# Altium PCB Motherboard.PcbDoc (part 3 of 4)
Units mm, origin at the board's own origin, x right, y up, seen from the top; angles counter-clockwise.
Board outline 133.86 x 61.62 mm, 4 copper layers (Top Layer, Ground Plane, Power Plane, Bottom Layer), stack 1.586 mm thick; 226 components, 149 nets, 791 pads, 852 vias.
Unrouted connection lines stored in the file: 19.
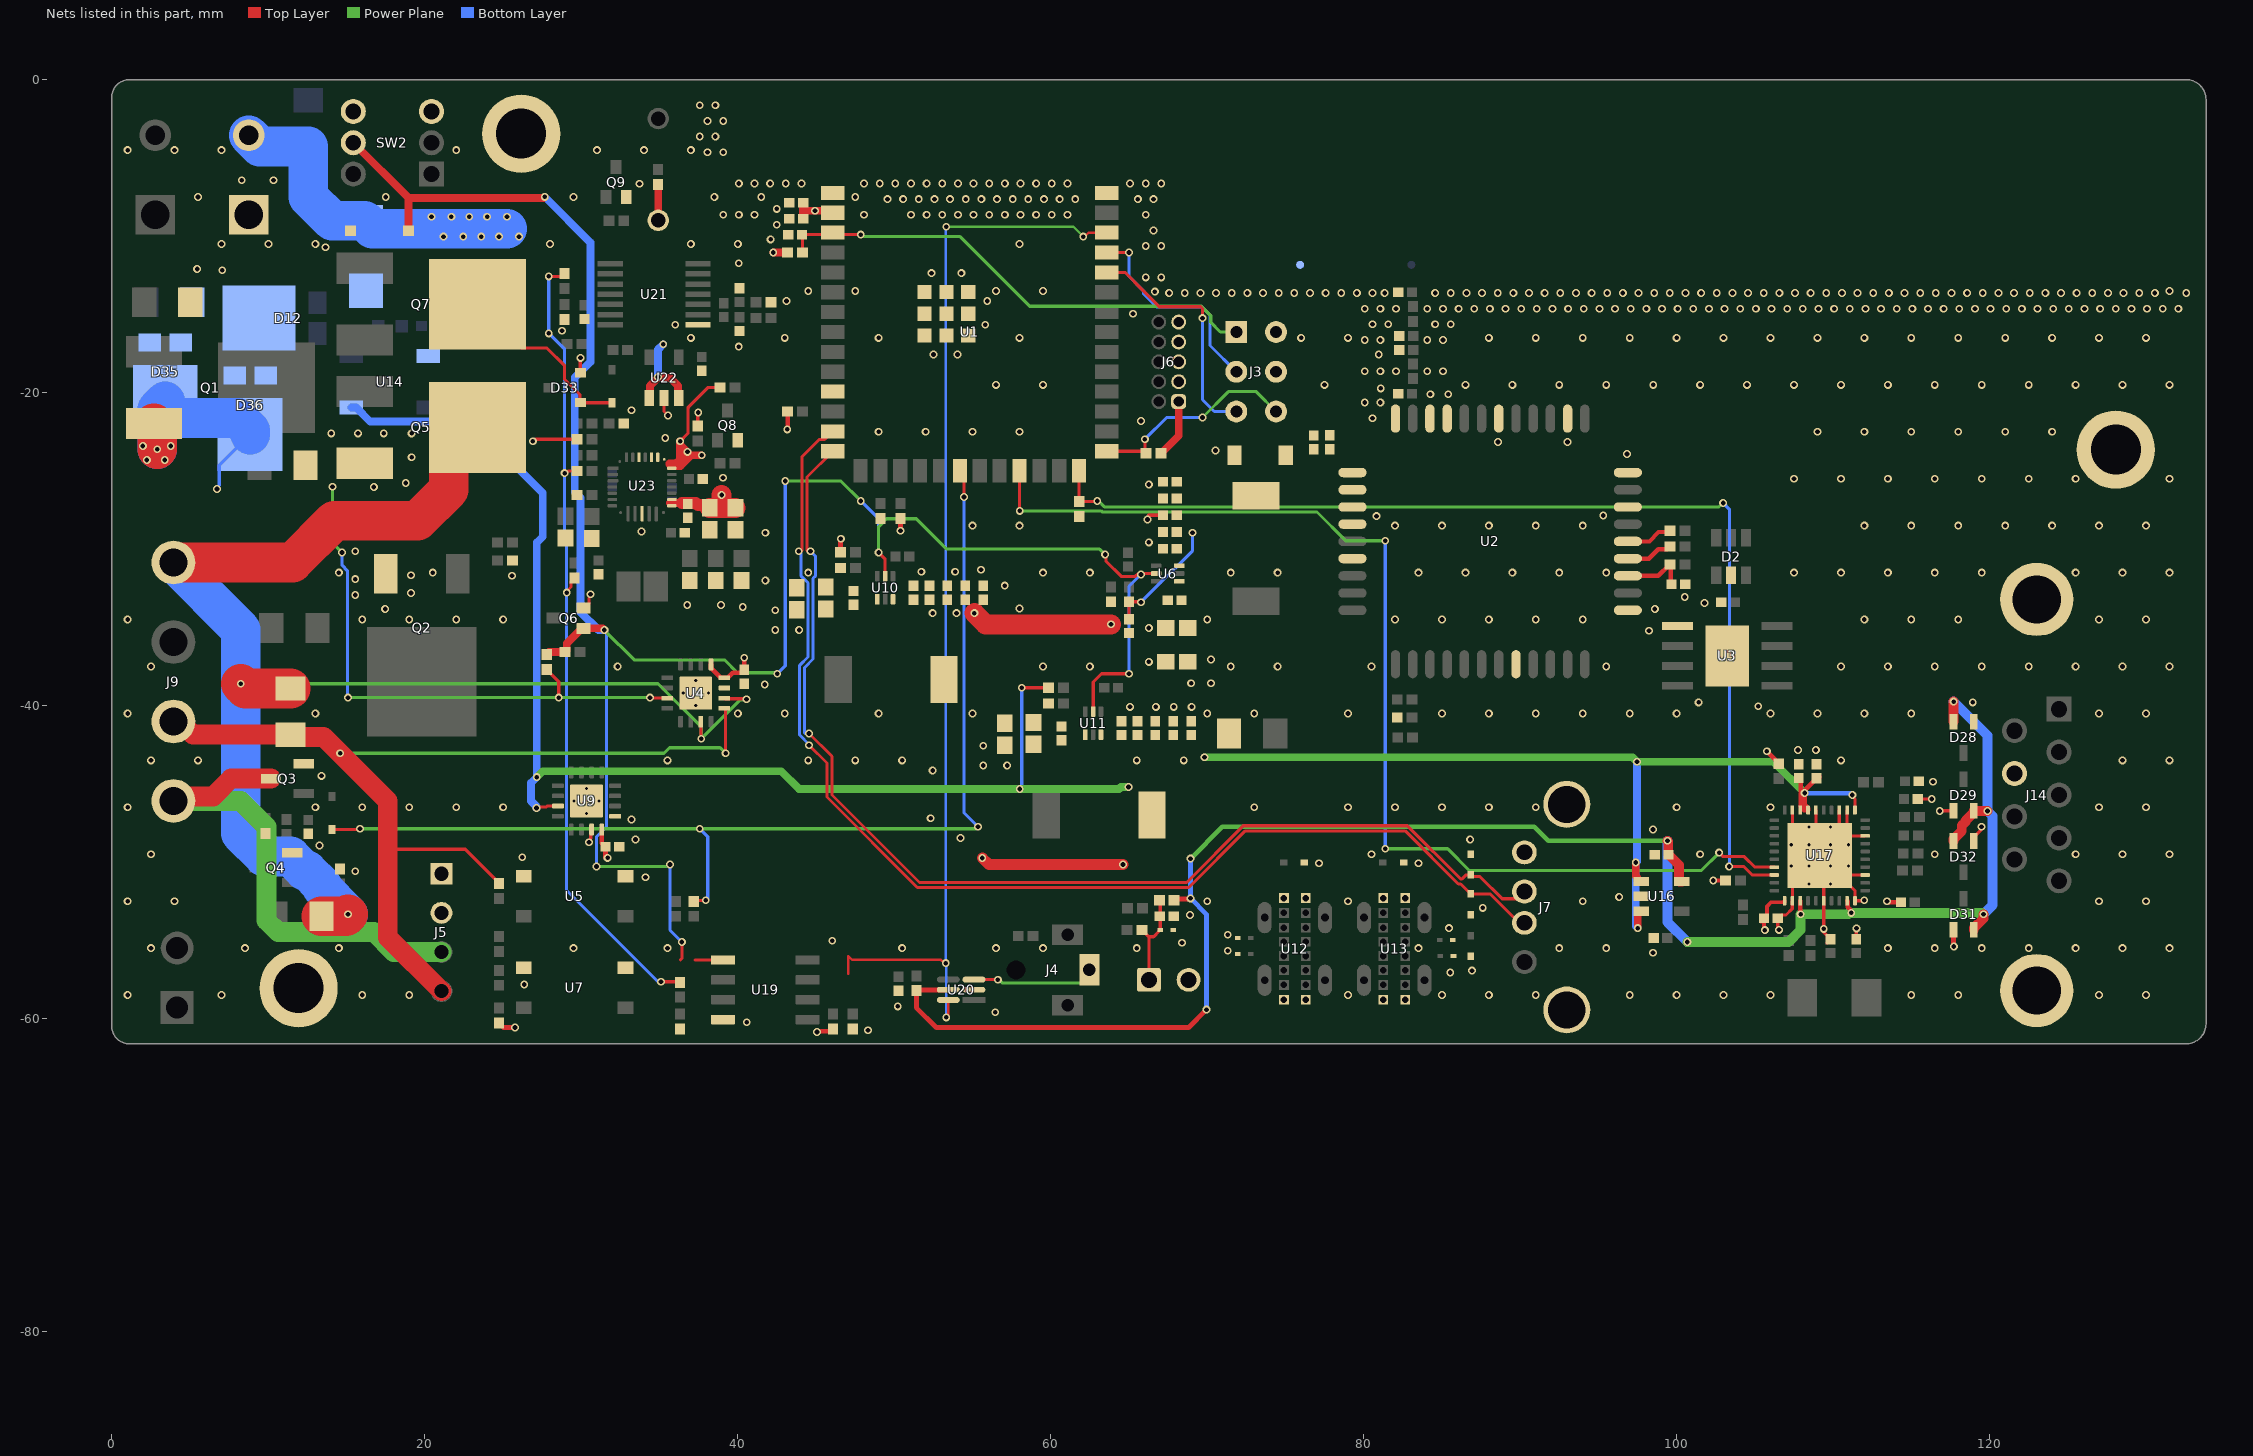
[diagram p4: the nets of this part, all layers, seen from the top]

## Via types
v1: diameter 0.5, hole 0.3, Top Layer to Bottom Layer, tented both sides, 819 vias
v2: diameter 0.5, hole 0.2, Top Layer to Bottom Layer, 20 vias
v3: diameter 0.508, hole 0.3, Top Layer to Bottom Layer, tented both sides, 8 vias
v4: diameter 0.5, hole 0.3, Top Layer to Bottom Layer, 5 vias

## Nets (pads, with @x,y where several pads share a name; then routed paths per layer and width w, separated by ;. In a path a pad name is that pad's centre, name@x,y a point inside that pad or via, vN(x,y) a via of type N, cw(c..) or ccw(c..) an arc to the next point about the centre after c; other vN are vias at no path point) (continued)
DGND: (continued)
  Top Layer w0.203: v1(26.924,-23.114) 27.051,-22.987 R94.1@29.751,-22.987 ; Q6.2@30.16,-33.767 30.26,-33.767 30.508,-33.519 30.508,-33.119 30.607,-33.02 v1(30.607,-32.893) ; v1@30.512,-48.74 30.512,-48.609 30.63,-48.491 30.63,-47.974 U9.3@30.678,-47.926 ; U22.2@35.306,-20.35 35.306,-21.209 v1(35.56,-21.463) ; R57.1@37.465,-22.131 37.465,-21.3 v1(37.494,-21.27) ; v1(66.205,-28.114) 66.262,-28.057 66.262,-27.845 66.268,-27.839 C38.1@67.192,-27.839 ; v1(106.571,-54.338) 106.485,-54.252 C59.1@106.485,-53.594 106.693,-53.386 107.015,-53.386 107.41,-52.991 107.41,-52.493 U17.32@107.423,-52.48 107.423,-51.33 v2(108.488,-50.265) U17.41@109.173,-49.58 ; U17.19@107.423,-46.68 107.423,-47.83 v2(108.488,-48.895) U17.41@108.923,-49.33 ; U17.16@108.923,-46.68 U17.41@108.923,-49.33 ; C58.1@109.65,-55.163 109.858,-54.955 C58.1@109.858,-54.935 109.858,-54.915 109.423,-54.48 109.423,-51.672 109.379,-51.629 109.379,-50.067 U17.41@109.52,-49.927 ; U17.13@110.423,-46.68 U17.41@110.423,-48.33 ; U17.12@110.923,-46.68 110.923,-47.83 U17.41@110.423,-48.33 ; C54.1@111.509,-54.935 111.509,-54.232 111.515,-54.238 v1(111.515,-54.243) ; v1(112.014,-52.451) 111.985,-52.48 U17.40@111.423,-52.48 111.423,-51.83 U17.41@110.423,-50.83 ; U17.3@112.073,-50.83 U17.41@110.423,-50.83 ; U17.8@112.073,-48.33 U17.41@110.423,-48.33 ; C56.1@115.437,-45.977 116.202,-45.977 116.205,-45.974 v1(116.332,-45.974) ; v1(116.84,-46.736) 116.856,-46.72 D29.1@117.714,-46.72 ; D32.1@119.014,-48.657 119.014,-48.407 119.457,-47.964 119.457,-47.809 v1(119.514,-47.752) ; U17.41@108.923,-49.33 U17.41@109.173,-49.58 ; U17.41@109.173,-49.58 109.85,-49.58 110.423,-49.007 U17.41@110.423,-48.33 ; U17.41@109.173,-49.58 U17.41@109.52,-49.927 ; U17.41@109.52,-49.927 v2(109.858,-50.265) U17.41@110.423,-50.83
  Top Layer w0.3: v1(113.464,-52.514) 113.474,-52.514 113.538,-52.578 C55.1@114.368,-52.578 ; D31.1@117.714,-54.34 117.714,-55.357 117.741,-55.384 v1(117.741,-55.402)
  other v1: 48.344,-60.752 40.597,-60.244 56.472,-59.609 50.249,-59.228 1.025,-58.505 7.025,-58.505 16.025,-58.505 19.025,-58.505 79.025,-58.505 85.025,-58.505 88.025,-58.505 91.025,-58.505 97.025,-58.505 100.025,-58.505 103.025,-58.505 106.025,-58.505 115.025,-58.505 118.025,-58.505 127.025,-58.505 130.025,-58.505 26.373,-57.831 85.555,-57.069 86.952,-56.942 98.509,-55.799 71.331,-55.672 2.525,-55.505 8.525,-55.505 14.525,-55.505 29.525,-55.505 35.525,-55.505 50.525,-55.505 56.525,-55.505 59.525,-55.505 65.525,-55.505 83.525,-55.505 92.525,-55.505 95.525,-55.505 113.525,-55.505 116.525,-55.505 119.525,-55.505 122.525,-55.505 125.525,-55.505 128.525,-55.505 131.525,-55.505 68.41,-55.164 46.058,-55.037 71.331,-54.656 109.431,-54.275 85.471,-54.229 68.918,-53.386 87.63,-52.934 1.025,-52.505 4.025,-52.505 70.025,-52.505 79.025,-52.505 94.025,-52.505 127.025,-52.505 130.025,-52.505 96.35,-52.243 34.12,-50.973 15.578,-50.592 77.173,-50.084 83.523,-50.084 26.246,-49.703 2.525,-49.505 80.525,-49.505 101.525,-49.505 116.525,-49.505 125.525,-49.505 128.525,-49.505 131.525,-49.505 13.292,-48.941 30.511,-48.74 33.485,-48.56 86.825,-48.56 98.509,-47.925 33.231,-47.29 1.025,-46.505 13.025,-46.505 16.025,-46.505 19.025,-46.505 22.025,-46.505 25.025,-46.505 73.025,-46.505 79.025,-46.505 82.025,-46.505 85.025,-46.505 88.025,-46.505 91.025,-46.505 100.025,-46.505 106.025,-46.505 127.025,-46.505 130.025,-46.505 116.416,-44.877 13.419,-44.496 2.525,-43.505 5.525,-43.505 35.525,-43.505 44.525,-43.505 47.525,-43.505 50.525,-43.505 65.525,-43.505 68.525,-43.505 110.525,-43.505 128.525,-43.505 131.525,-43.505 107.78,-42.845 108.923,-42.845 1.025,-40.505 13.025,-40.505 40.025,-40.505 43.025,-40.505 49.025,-40.505 55.025,-40.505 70.025,-40.505 73.025,-40.505 79.025,-40.505 85.025,-40.505 88.025,-40.505 91.025,-40.505 94.025,-40.505 97.025,-40.505 100.025,-40.505 106.025,-40.505 109.025,-40.505 112.025,-40.505 115.025,-40.505 127.025,-40.505 130.025,-40.505 65.089,-40.086 66.74,-40.086 67.883,-40.086 69.026,-40.086 105.24,-40.051 101.43,-39.797 118.956,-39.797 41.74,-38.654 2.525,-37.505 32.342,-37.511 59.525,-37.505 62.525,-37.505 71.525,-37.505 74.525,-37.505 80.525,-37.505 95.525,-37.505 110.525,-37.505 113.525,-37.505 116.525,-37.505 119.525,-37.505 122.525,-37.505 125.525,-37.505 128.525,-37.505 131.525,-37.505 66.294,-37.211 98.255,-35.225 66.294,-35.052 1.025,-34.505 16.025,-34.505 19.025,-34.505 22.025,-34.505 25.025,-34.505 70.025,-34.505 82.025,-34.505 85.025,-34.505 88.025,-34.505 91.025,-34.505 94.025,-34.505 112.025,-34.505 115.025,-34.505 118.025,-34.505 127.025,-34.505 130.025,-34.505 17.483,-33.828 98.636,-33.828 58.025,-33.798 40.343,-33.701 36.787,-33.574 38.946,-33.574 101.811,-33.447 100.541,-33.066 15.578,-32.939 19.134,-32.812 57.088,-32.339 41.783,-32.004 15.578,-31.923 25.592,-31.704 19.134,-31.669 14.525,-31.505 20.525,-31.505 44.525,-31.505 59.525,-31.505 62.525,-31.505 71.525,-31.505 74.525,-31.505 83.525,-31.505 86.525,-31.505 89.525,-31.505 92.525,-31.505 95.525,-31.505 107.525,-31.505 110.525,-31.505 113.525,-31.505 116.525,-31.505 119.525,-31.505 125.525,-31.505 128.525,-31.505 131.525,-31.505 51.754,-31.45 53.913,-31.45 55.564,-31.323 15.578,-30.145 66.294,-29.572 41.783,-28.956 33.866,-28.875 55.025,-28.505 58.025,-28.505 82.025,-28.505 85.025,-28.505 88.025,-28.505 91.025,-28.505 94.025,-28.505 112.025,-28.505 115.025,-28.505 118.025,-28.505 121.025,-28.505 124.025,-28.505 127.025,-28.505 130.025,-28.505 80.837,-27.894 95.334,-27.859 66.294,-25.879 107.525,-25.505 110.525,-25.505 113.525,-25.505 116.525,-25.505 119.525,-25.505 122.525,-25.505 125.525,-25.505 131.525,-25.505 39.073,-25.446 96.858,-23.922 70.55,-23.703 88.603,-23.16 93.048,-23.16 35.39,-22.906 49.025,-22.505 52.025,-22.505 55.025,-22.505 58.025,-22.505 109.025,-22.505 112.025,-22.505 115.025,-22.505 118.025,-22.505 121.025,-22.505 124.025,-22.505 65.786,-21.822 80.59,-21.637 33.231,-21.128 80.09,-20.637 81.09,-20.637 84.285,-20.112 85.428,-20.112 81.11,-19.731 56.525,-19.505 59.525,-19.505 77.525,-19.505 86.525,-19.505 89.525,-19.505 92.525,-19.505 95.525,-19.505 98.525,-19.505 101.525,-19.505 104.525,-19.505 107.525,-19.505 110.525,-19.505 113.525,-19.505 116.525,-19.505 119.525,-19.505 122.525,-19.505 125.525,-19.505 128.525,-19.505 131.525,-19.505 80.09,-18.637 81.09,-18.637 82.09,-18.637 84.09,-18.637 85.09,-18.637 52.535,-17.572 54.059,-17.572 80.983,-17.572 40.089,-17.064 80.09,-16.637 81.09,-16.637 84.09,-16.637 85.09,-16.637 37.025,-16.505 43.025,-16.505 49.025,-16.505 58.025,-16.505 76.025,-16.505 79.025,-16.505 88.025,-16.505 91.025,-16.505 94.025,-16.505 97.025,-16.505 100.025,-16.505 103.025,-16.505 106.025,-16.505 109.025,-16.505 112.025,-16.505 115.025,-16.505 118.025,-16.505 121.025,-16.505 124.025,-16.505 127.025,-16.505 130.025,-16.505 28.786,-16.048 36.025,-15.667 55.837,-15.667 80.59,-15.637 81.59,-15.637 84.59,-15.637 85.59,-15.637 65.278,-14.964 80.09,-14.637 81.09,-14.637 82.09,-14.637 84.09,-14.637 85.09,-14.637 86.09,-14.637 87.09,-14.637 88.09,-14.637 89.09,-14.637 90.09,-14.637 91.09,-14.637 92.09,-14.637 93.09,-14.637 94.09,-14.637 95.09,-14.637 96.09,-14.637 97.09,-14.637 98.09,-14.637 99.09,-14.637 100.09,-14.637 101.09,-14.637 102.09,-14.637 103.09,-14.637 104.09,-14.637 105.09,-14.637 106.09,-14.637 107.09,-14.637 108.09,-14.637 109.09,-14.637 110.09,-14.637 111.09,-14.637 112.09,-14.637 113.09,-14.637 114.09,-14.637 115.09,-14.637 116.09,-14.637 117.09,-14.637 118.09,-14.637 119.09,-14.637 120.09,-14.637 121.09,-14.637 122.09,-14.637 123.09,-14.637 124.09,-14.637 125.09,-14.637 126.09,-14.637 127.09,-14.637 128.09,-14.637 129.09,-14.637 130.09,-14.637 131.09,-14.637 132.09,-14.637 43.137,-14.143 55.964,-14.143 67.59,-13.637 68.59,-13.637 69.59,-13.637 70.59,-13.637 71.59,-13.637 72.59,-13.637 73.59,-13.637 74.59,-13.637 75.59,-13.637 76.59,-13.637 77.59,-13.637 78.59,-13.637 79.59,-13.637 80.59,-13.637 81.364,-13.635 84.59,-13.637 85.59,-13.637 86.59,-13.637 87.59,-13.637 88.59,-13.637 89.59,-13.637 90.59,-13.637 91.59,-13.637 92.59,-13.637 93.59,-13.637 94.59,-13.637 95.59,-13.637 96.59,-13.637 97.59,-13.637 98.59,-13.637 99.59,-13.637 100.59,-13.637 101.59,-13.637 102.59,-13.637 103.59,-13.637 104.59,-13.637 105.59,-13.637 106.59,-13.637 107.59,-13.637 108.59,-13.637 109.59,-13.637 110.59,-13.637 111.59,-13.637 112.59,-13.637 113.59,-13.637 114.59,-13.637 115.59,-13.637 116.59,-13.637 117.59,-13.637 118.59,-13.637 119.59,-13.637 120.59,-13.637 121.59,-13.637 122.59,-13.637 123.59,-13.637 124.59,-13.637 125.59,-13.637 126.59,-13.637 127.59,-13.637 128.59,-13.637 129.59,-13.637 130.59,-13.637 132.59,-13.637 66.677,-13.55 44.525,-13.505 47.525,-13.505 56.525,-13.505 59.525,-13.505 131.525,-13.505 66.09,-12.637 67.09,-12.637 52.408,-12.365 54.313,-12.365 7.072,-12.187 5.466,-12.101 40.089,-11.73 13.673,-10.714 66.09,-10.637 67.09,-10.637 7.025,-10.505 10.025,-10.505 13.025,-10.505 28.025,-10.505 37.025,-10.505 40.025,-10.505 58.025,-10.505 42.121,-10.206 66.59,-9.637 42.507,-9.276 39.09,-8.637 40.09,-8.637 41.09,-8.637 48.09,-8.637 51.09,-8.637 52.09,-8.637 53.09,-8.637 54.09,-8.637 55.09,-8.637 56.09,-8.637 57.09,-8.637 58.09,-8.637 59.09,-8.637 60.09,-8.637 61.09,-8.637 66.09,-8.637 42.507,-8.26 49.59,-7.637 50.59,-7.637 51.59,-7.637 52.59,-7.637 53.59,-7.637 54.59,-7.637 55.59,-7.637 56.59,-7.637 57.59,-7.637 58.59,-7.637 59.59,-7.637 60.59,-7.637 61.59,-7.637 65.59,-7.637 66.59,-7.637 5.525,-7.505 17.525,-7.505 29.525,-7.505 38.525,-7.505 41.525,-7.505 47.525,-7.505 33.739,-6.65 40.09,-6.637 41.09,-6.637 42.09,-6.637 43.09,-6.637 44.09,-6.637 48.09,-6.637 49.09,-6.637 50.09,-6.637 51.09,-6.637 52.09,-6.637 53.09,-6.637 54.09,-6.637 55.09,-6.637 56.09,-6.637 57.09,-6.637 58.09,-6.637 59.09,-6.637 60.09,-6.637 61.09,-6.637 65.09,-6.637 66.09,-6.637 67.09,-6.637 8.32,-6.431 10.352,-6.431 38.09,-4.637 39.09,-4.637 1.025,-4.505 4.025,-4.505 7.025,-4.505 22.025,-4.505 31.025,-4.505 34.025,-4.505 37.025,-4.505 37.59,-3.637 38.59,-3.637 38.09,-2.637 39.09,-2.637 37.59,-1.637 38.59,-1.637
  other v2: 108.488,-51.405 109.858,-51.405 107.348,-50.265 110.998,-50.265 107.348,-48.895 109.858,-48.895 110.998,-48.895 108.488,-47.755 109.858,-47.755 30.353,-46.901 29.553,-46.101 31.153,-46.101 30.353,-45.301 37.338,-40.005 36.538,-39.205 38.138,-39.205 37.338,-38.405
ESP32_EN: C17.2 J3.1 R2.1 U1.3 | length 31.8
  Top Layer w0.203: R2.1@44.163,-11.049 44.163,-9.941 C17.2@44.128,-9.906 45.974,-9.906 U1.3@46.101,-9.779 46.228,-9.906 v1(47.879,-9.906)
  Power Plane w0.203: v1(47.879,-9.906) 48.006,-10.033 54.229,-10.033 58.674,-14.478 69.638,-14.478 70.252,-15.092 70.252,-15.515 70.866,-16.129 J3.1@71.882,-16.129
ESP32_IO0: J3.6 R31.1 U1.27 | length 13.6
  Top Layer w0.203: U1.27@63.601,-23.749 65.979,-23.749 R31.1@66.04,-23.81 ; v1(66.04,-22.987) R31.1@66.04,-23.81 ; R31.1@66.106,-23.876 R31.1@66.04,-23.81
  Power Plane w0.203: v1(69.723,-21.59) 71.374,-19.939 73.152,-19.939 J3.6@74.422,-21.209
  Bottom Layer w0.203: v1(66.04,-22.987) 67.437,-21.59 v1(69.723,-21.59)
FAN+: J5.1 J9.2 R5.2 R14.2 U4.1 | length 65.3
  Top Layer w0.2: 17.653,-49.403 17.866,-49.19 22.606,-49.19 24.765,-51.349 R14.2@24.765,-51.374 ; U4.1@39.163,-40.18 39.193,-40.18 39.243,-40.23 v1(39.243,-43.053)
  Top Layer w1.27: J9.2@3.952,-41.021 4.366,-41.021 5.206,-41.861 R5.2@11.43,-41.861 11.57,-42.001 13.553,-42.001 v1(14.605,-43.053) 17.653,-46.101 17.653,-49.403 17.653,-54.824 21.082,-58.253
  Power Plane w0.2: v1(14.605,-43.053) 35.306,-43.053 35.656,-42.703 38.893,-42.703 v1(39.243,-43.053)
FAN-: J5.2 J9.1 Q3.3 | length 31.5
  Top Layer w1.27: J9.1@3.952,-46.101 4.245,-45.809 6.498,-45.809 7.637,-44.67 Q3.3@10.192,-44.67
  Power Plane w1.27: J9.1@3.952,-46.101 8.255,-46.101 9.906,-47.752 9.906,-53.739 10.65,-54.483 16.764,-54.483 18.034,-55.753 21.082,-55.753
FAN_CTL: D9.2 R7.2 U1.20 | length 70.2
  Top Layer w0.2: D9.2@14.097,-47.918 15.836,-47.918 v1(15.875,-47.879) ; R7.2@37.211,-52.517 37.277,-52.451 v1(37.973,-52.451) ; U1.20@54.216,-24.999 54.483,-25.266 v1(54.483,-26.67)
  Power Plane w0.2: v1(15.875,-47.879) v1(37.592,-47.879) 55.245,-47.879 v1(55.372,-47.752)
  Bottom Layer w0.2: v1(37.592,-47.879) 38.1,-48.387 38.1,-52.334 37.983,-52.451 v1(37.973,-52.451) ; v1(54.483,-26.67) 54.483,-46.863 v1(55.372,-47.752)
GSM_CLK: R17.2 U2.16 | length 3
  Top Layer w0.3: U2.16@96.907,-30.612 98.257,-30.612 98.849,-30.02 99.426,-30.02 R17.2@99.601,-29.845
GSM_DATA: C12.2 R16.2 U2.15 | length 4.3
  Top Layer w0.3: U2.15@96.907,-31.712 98.852,-31.712 99.576,-30.988 R16.2@99.601,-30.988 99.648,-31.035 99.648,-32.211 C12.2@99.695,-32.258
GSM_RST: R18.2 U2.17 | length 3
  Top Layer w0.254: U2.17@96.907,-29.512 98.28,-29.512 98.87,-28.922 99.508,-28.922 R18.2@99.601,-28.829